# Altium PCB MainBoardPCB1.PcbDoc (part 11 of 40)
Units mm, origin at the board's own origin, x right, y up, seen from the top; angles counter-clockwise.
Board outline 258.95 x 308.86 mm, 16 copper layers (L1, L2 (GND), L3 (Sign), L4 (GND), L5 (Sign), L6 (PWR/GND), L7(PWR/GND), L8 (Plane_GND), L9 (PWR/GND), L10 (PWR/GND), L11 (PWR/GND), L12 (Sign), L13 (GND), L14 (Sign), L15 (GND), L16), stack 2.502 mm thick; 2397 components, 1744 nets, 8397 pads, 4112 vias.
Unrouted connection lines stored in the file: 3547.
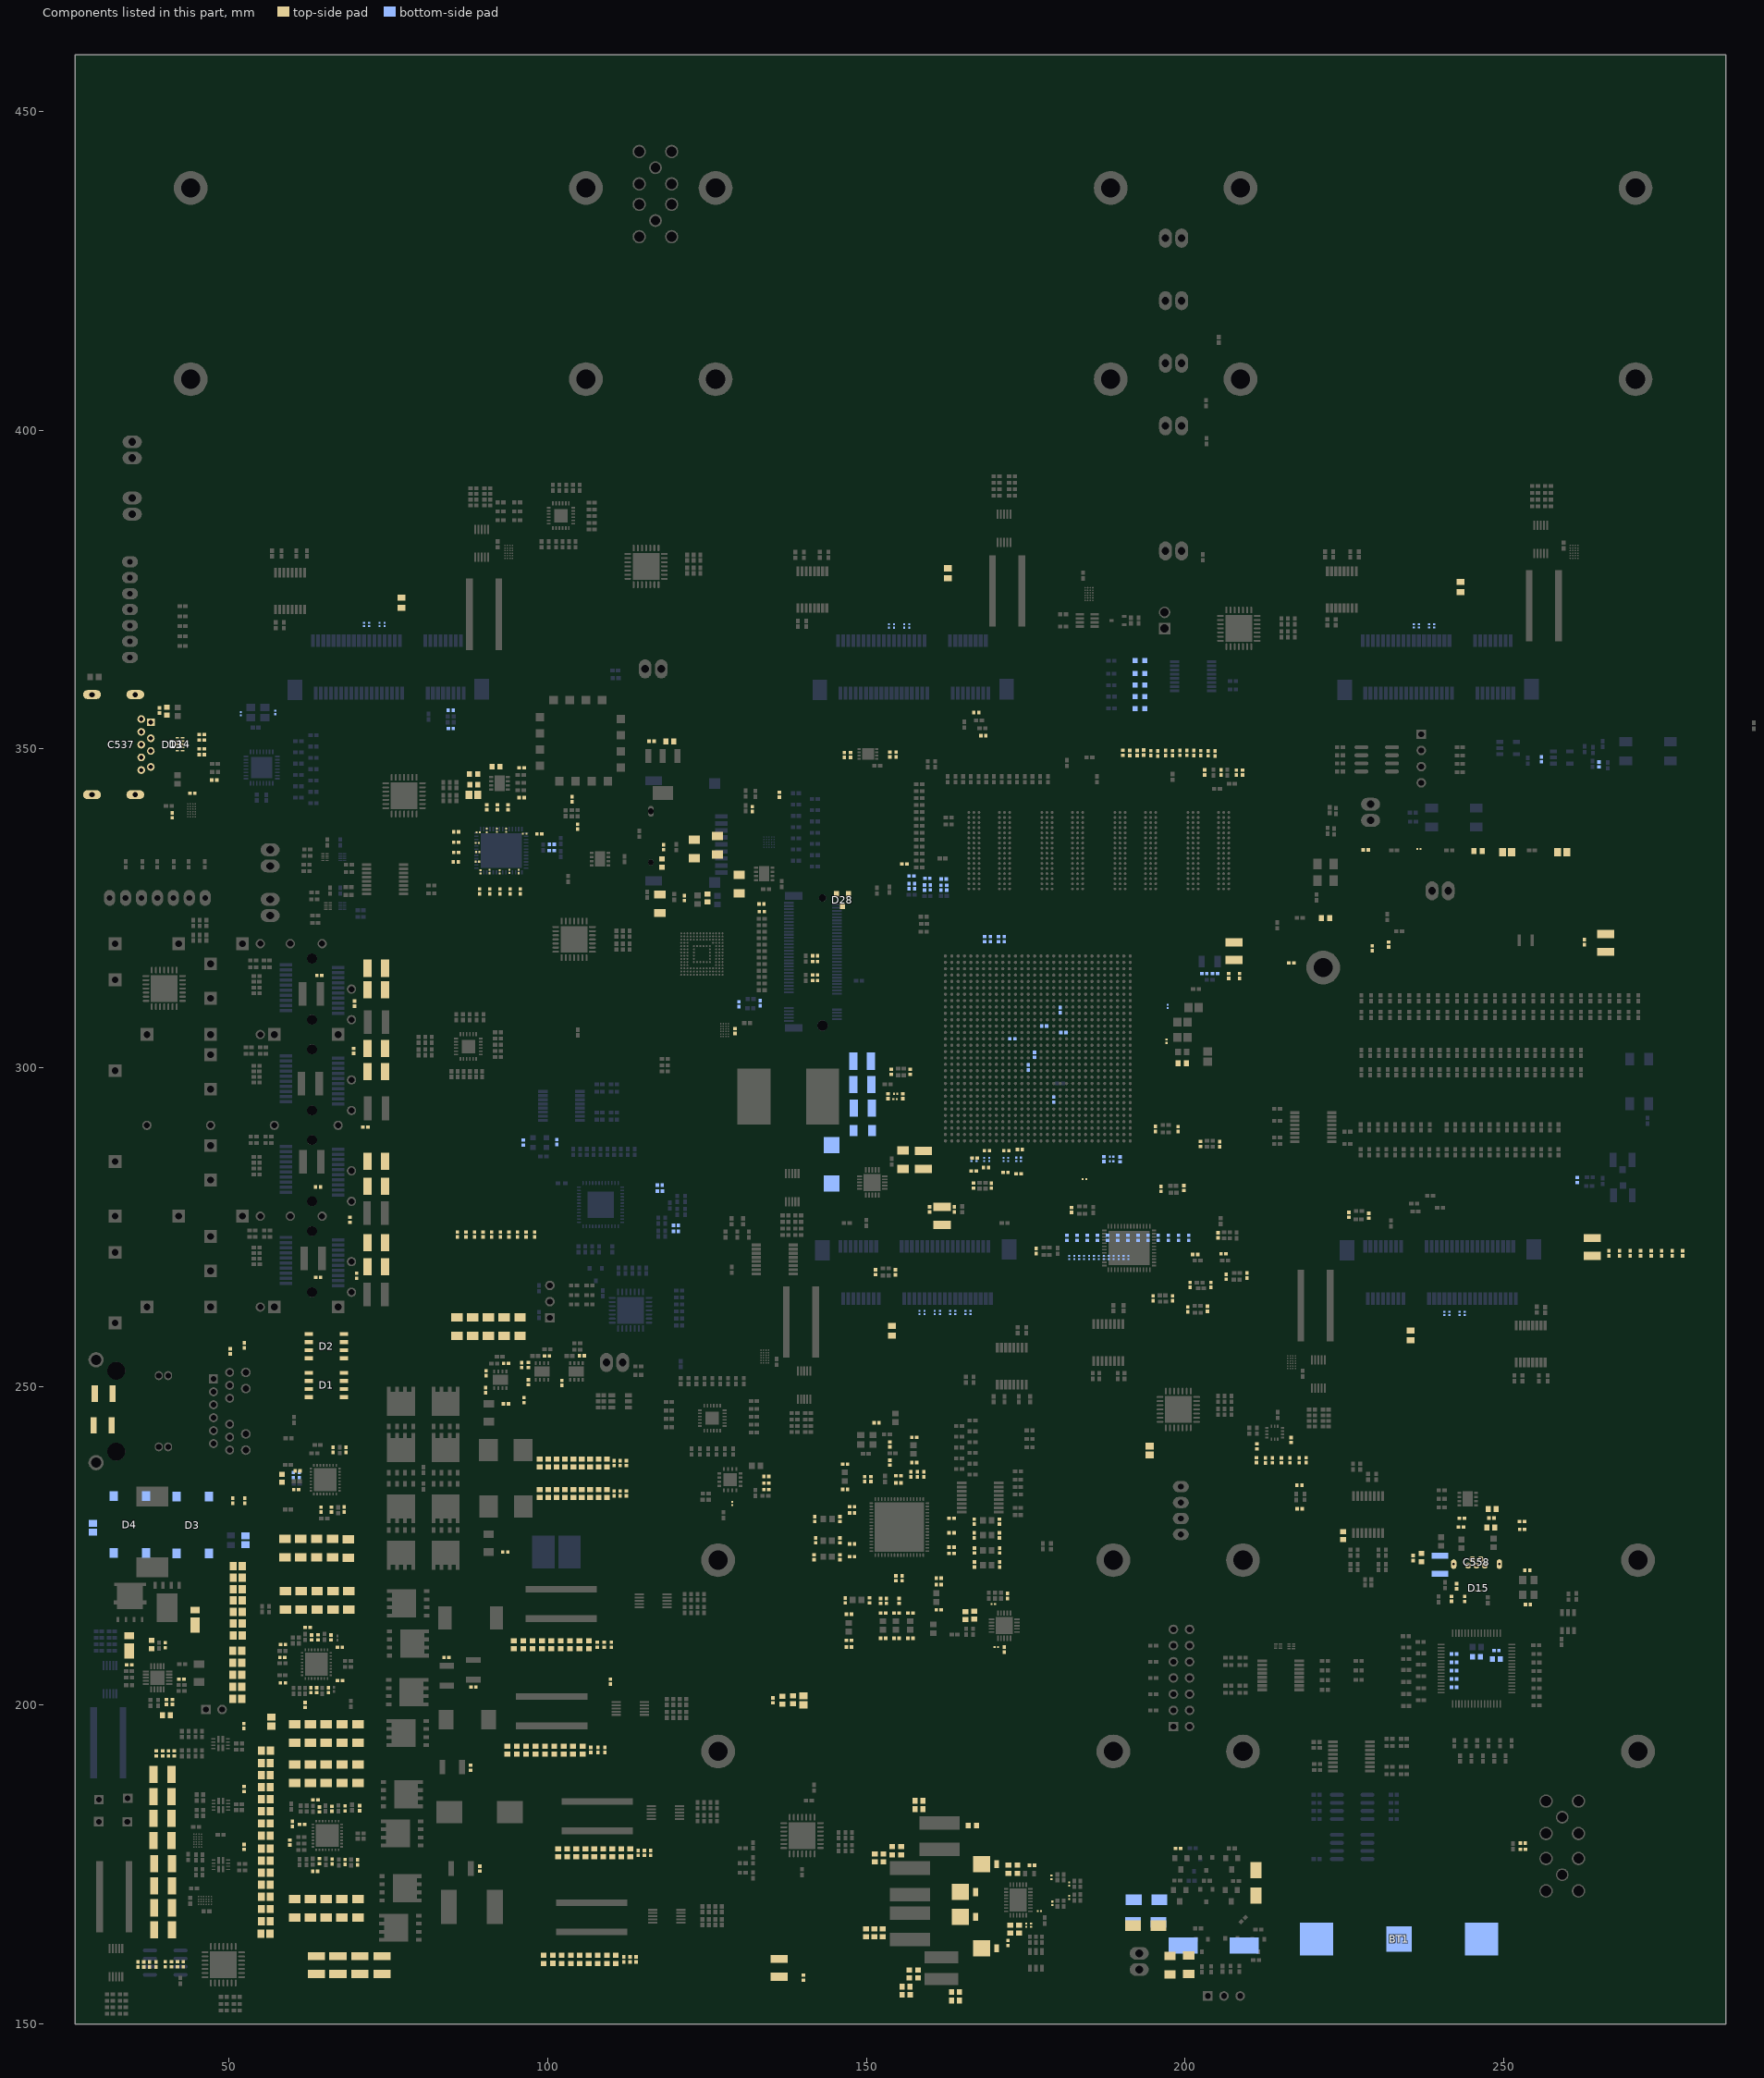
[diagram p19: the components of this part, seen from the top]

## Part data (continued)
D14: "TVS DIODE 5.5V 8V 10SON", Breakdown Voltage=7V, Capacitance=0.8pF, Clamping Voltage=8V, Current Rating=5A, Manufacturer="Texas Instruments", Max Operating Temperature=85°C, Min Operating Temperature=-40°C, Package Quantity=1, Peak Pulse Current=1A, Peak Pulse Power=45W, Power Line Protection=Yes, Reverse Standoff Voltage=5.5V, Supplier Part Number 1=296-28063-1-ND, Category="TVS Diodes", ComponentLink1Description=https://datasheet.ciiva.com/339/tpd4eusb30-339202.pdf?src-supplier=Digi-Key, ComponentLink1URL=https://datasheet.ciiva.com/339/tpd4eusb30-339202.pdf?src-supplier=Digi-Key, ComponentLink2Description=https://datasheet.ciiva.com/41659/1634000-41659268.pdf?src-supplier=Farnell, ComponentLink2URL=https://datasheet.ciiva.com/41659/1634000-41659268.pdf?src-supplier=Farnell, ComponentLink3Description=https://datasheet.ciiva.com/15134/getdatasheetpartid-299321-15134669.pdf?src-supplier=Verical, ComponentLink3URL=https://datasheet.ciiva.com/15134/getdatasheetpartid-299321-15134669.pdf?src-supplier=Verical, ComponentLink4Description=https://datasheet.ciiva.com/339/tpd4eusb30-339204.pdf?src-supplier=Digi-Key, ComponentLink4URL=https://datasheet.ciiva.com/339/tpd4eusb30-339204.pdf?src-supplier=Digi-Key, ComponentLink5Description=https://datasheet.ciiva.com/1504/1882087-1504249.pdf?src-supplier=Element14, ComponentLink5URL=https://datasheet.ciiva.com/1504/1882087-1504249.pdf?src-supplier=Element14, ComponentLink6Description=https://datasheet.ciiva.com/339/tpd4eusb30-339203.pdf?src-supplier=Digi-Key, ComponentLink6URL=https://datasheet.ciiva.com/339/tpd4eusb30-339203.pdf?src-supplier=Digi-Key, ComponentLink7Description=https://datasheet.ciiva.com/22621/1882087-22621482.pdf?src-supplier=Element14, ComponentLink7URL=https://datasheet.ciiva.com/22621/1882087-22621482.pdf?src-supplier=Element14, Data Rate=6Gbps, Depth=1mm, Direction=Unidirectional, ESD Protection=Yes, Height=0.5mm, Interface=USB, Lead Free="Lead Free", Length=2.5mm, Manufacturer Part Number=TPD4EUSB30DQAR, Min Breakdown Voltage=8V, Number of Bidirectional Channels=4, Number of Channels=4, Number of Pins=10, Packaging="Tape and Reel", Pricing 1="1=0,81000, 10=0,71400, 25=0,67040, 100=0,48670, 250=0,46936, 500=0,40664, 1000=0,34608 (USD)", Radiation Hardening=No, REACH SVHC="No SVHC", RoHS=Yes, Stock 1=69157, Supplier 1=Digi-Key, Termination=SMD/SMT, Width=1.1mm, Working Voltage=5.5V
D16 D17 D18 D19: library part MBRM140T1G, Supplier Part Number 1=MBRM140T3GOSCT-ND, Supplier 1=Digi-Key
D20 D21 D23 D24: "DIODE GEN PURP 1KV 1A SMA", Average Rectified Current=1A, Capacitance=10pF, Case/Package=SMA, Forward Voltage="Vf = 1.1V", Manufacturer=Diodes, Max Forward Surge Current (Ifsm)=30A, Max Operating Temperature=150°C, Max Repetitive Reverse Voltage (Vrrm)=1kV, Min Operating Temperature=-65°C, Package Quantity=5000, Peak Reverse Current=5uA, Supplier Part Number 1=S1M-FDICT-ND, Category="Rectifier Diodes", ComponentLink1Description=https://datasheet.ciiva.com/34302/1541642-34302418.pdf?src-supplier=Jameco, ComponentLink1URL=https://datasheet.ciiva.com/34302/1541642-34302418.pdf?src-supplier=Jameco, ComponentLink2Description=https://datasheet.ciiva.com/22695/1911706-22695834.pdf?src-supplier=Element14, ComponentLink2URL=https://datasheet.ciiva.com/22695/1911706-22695834.pdf?src-supplier=Element14, Current Rating=1A, Forward Current=1A, Height=2.1mm, Lead Free="Lead Free", Length=4.6mm, Manufacturer Part Number=S1M-13-F, Max Reverse Voltage (DC)=1kV, Number of Pins=2, Output Current=1A, Packaging="Tape and Reel", Peak Non-Repetitive Surge Current=30A, Polarity=Standard, Pricing 1="1=0,25000, 10=0,20100, 25=0,16840, 100=0,08240, 250=0,08104, 500=0,06870, 1000=0,04774, 2500=0,04437 (USD)", Radiation Hardening=No, REACH SVHC="No SVHC", Recovery Time=1.8us, Reverse Recovery Time=3us, Reverse Voltage (DC)=1kV, RoHS=Yes, Stock 1=1021310, Supplier 1=Digi-Key, Termination=SMD/SMT, Voltage Rating (DC)=1kV, Weight=0.002258oz, Width=2.92mm
D26 D27: "DIODE SCHOTTKY 100V POWERDI123", Average Rectified Current=1A, Capacitance=36pF, Forward Voltage=770mV, Manufacturer=Diodes, Max Forward Surge Current (Ifsm)=40A, Max Operating Temperature=175°C, Max Repetitive Reverse Voltage (Vrrm)=100V, Min Operating Temperature=-55°C, Package Quantity=3000, Peak Non-Repetitive Surge Current=50A, Peak Reverse Current=1uA, Supplier Part Number 1=DFLS1100DICT-ND, Category="Rectifier Diodes", ComponentLink1Description=https://datasheet.ciiva.com/6932/ds30497-6932064.pdf?src-supplier=Newark, ComponentLink1URL=https://datasheet.ciiva.com/6932/ds30497-6932064.pdf?src-supplier=Newark, ComponentLink2Description=https://datasheet.ciiva.com/4715/ds30497-81105-4715653.pdf?src-supplier=Mouser, ComponentLink2URL=https://datasheet.ciiva.com/4715/ds30497-81105-4715653.pdf?src-supplier=Mouser, ComponentLink3Description=https://datasheet.ciiva.com/4245/2460ds30497-4245287.pdf?src-supplier=Arrow, ComponentLink3URL=https://datasheet.ciiva.com/4245/2460ds30497-4245287.pdf?src-supplier=Arrow, ComponentLink4Description=https://datasheet.ciiva.com/15144/getdatasheetpartid-44146-15144126.pdf?src-supplier=Verical, ComponentLink4URL=https://datasheet.ciiva.com/15144/getdatasheetpartid-44146-15144126.pdf?src-supplier=Verical, ComponentLink5Description=https://datasheet.ciiva.com/26788/dfls1100-7-26788776.pdf?src-supplier=IIIC, ComponentLink5URL=https://datasheet.ciiva.com/26788/dfls1100-7-26788776.pdf?src-supplier=IIIC, ComponentLink6Description=https://datasheet.ciiva.com/914/ds30497-914548.pdf?src-supplier=Digi-Key, ComponentLink6URL=https://datasheet.ciiva.com/914/ds30497-914548.pdf?src-supplier=Digi-Key, ComponentLink7Description=https://datasheet.ciiva.com/914/ds30497-914549.pdf?src-supplier=Digi-Key, ComponentLink7URL=https://datasheet.ciiva.com/914/ds30497-914549.pdf?src-supplier=Digi-Key, ComponentLink8Description=https://datasheet.ciiva.com/914/ds30497-914550.pdf?src-supplier=Digi-Key, ComponentLink8URL=https://datasheet.ciiva.com/914/ds30497-914550.pdf?src-supplier=Digi-Key, ComponentLink9Description=https://datasheet.ciiva.com/7964/ds30497-7964246.pdf?src-supplier=Element14, ComponentLink9URL=https://datasheet.ciiva.com/7964/ds30497-7964246.pdf?src-supplier=Element14, ComponentLink10Description=https://datasheet.ciiva.com/22695/1915475-22695803.pdf?src-supplier=Element14, ComponentLink10URL=https://datasheet.ciiva.com/22695/1915475-22695803.pdf?src-supplier=Element14, Current Rating=1A, Element Configuration=Single, Forward Current=1A, Height=0.98mm, Lead Free="Lead Free", Length=2.8mm, Manufacturer Part Number=DFLS1100-7, Max Reverse Voltage (DC)=100V, Mount="Surface Mount", Number of Pins=2, Output Current=1A, Packaging="Tape and Reel", Polarity=Standard, Pricing 1="1=0,41000, 10=0,35100, 25=0,32760, 100=0,24340, 250=0,23120, 500=0,19000, 1000=0,15444 (USD)", Radiation Hardening=No, REACH SVHC="No SVHC", RoHS=Yes, Stock 1=113187, Supplier 1=Digi-Key, Termination=SMD/SMT, Voltage Rating (DC)=100V, Width=1.78mm
D28: "DIODE ARRAY SCHOTTKY 40V SOT23", Average Rectified Current=200mA, Capacitance=5pF, Case/Package=SOT-23, Forward Voltage=1V, Manufacturer=MCC, Max Forward Surge Current (Ifsm)=600mA, Max Operating Temperature=125°C, Max Repetitive Reverse Voltage (Vrrm)=40V, Max Reverse Leakage Current=200nA, Min Operating Temperature=-55°C, Package Quantity=3000, Power Dissipation=200mW, Supplier Part Number 1=BAS40-04TPMSCT-ND, ComponentLink1Description=https://datasheet.ciiva.com/23684/1684803-23684306.pdf?src-supplier=Newark, ComponentLink1URL=https://datasheet.ciiva.com/23684/1684803-23684306.pdf?src-supplier=Newark, ComponentLink2Description=https://datasheet.ciiva.com/4716/bas40-bas70sot-23-28891-4716000.pdf?src-supplier=Mouser, ComponentLink2URL=https://datasheet.ciiva.com/4716/bas40-bas70sot-23-28891-4716000.pdf?src-supplier=Mouser, ComponentLink3Description=https://datasheet.ciiva.com/906/bas40-bas70sot-23-906320.pdf?src-supplier=Digi-Key, ComponentLink3URL=https://datasheet.ciiva.com/906/bas40-bas70sot-23-906320.pdf?src-supplier=Digi-Key, ComponentLink4Description=https://datasheet.ciiva.com/15200/getdatasheetpartid-226544-15200426.pdf?src-supplier=Verical, ComponentLink4URL=https://datasheet.ciiva.com/15200/getdatasheetpartid-226544-15200426.pdf?src-supplier=Verical, ComponentLink5Description=https://datasheet.ciiva.com/7624/1684803-7624699.pdf?src-supplier=Element14, ComponentLink5URL=https://datasheet.ciiva.com/7624/1684803-7624699.pdf?src-supplier=Element14, ComponentLink6Description=https://datasheet.ciiva.com/906/bas40-bas70sot-23-906318.pdf?src-supplier=Digi-Key, ComponentLink6URL=https://datasheet.ciiva.com/906/bas40-bas70sot-23-906318.pdf?src-supplier=Digi-Key, ComponentLink7Description=https://datasheet.ciiva.com/906/bas40-bas70sot-23-906319.pdf?src-supplier=Digi-Key, ComponentLink7URL=https://datasheet.ciiva.com/906/bas40-bas70sot-23-906319.pdf?src-supplier=Digi-Key, Element Configuration=Single, Forward Current=200mA, Height=1.02mm, Lead Free="Lead Free", Length=3.04mm, Manufacturer Part Number=BAS40-04-TP, Max Reverse Voltage (DC)=40V, Max Surge Current=600mA, Mount="Surface Mount", Number of Pins=3, Packaging="Tape and Reel", Peak Non-Repetitive Surge Current=600mA, Peak Reverse Current=200nA, Pricing 1="1 = 0,39000, 10 = 0,28800, 25 = 0,25240, 100 = 0,13700, 250 = 0,13628, 500 = 0,11176, 1000 = 0,08292 (USD)", Radiation Hardening=No, REACH SVHC=Unknown, Recovery Time=5ns, Reverse Recovery Time=5ns, RoHS=Yes, Stock 1=1204011, Supplier 1=Digi-Key, Width=1.4mm
F1_PCIE0 F1_PCIE1 F1_PCIE2 F1_PCIE3 F1_PCIE4: library part Resistor, "FUSE BOARD MNT 500MA 32VDC 0805", Case/Package=SMD/SMT, Case Code (Imperial)=0805, Case Code (Metric)=2012, Current Rating=500mA, DC Cold Resistance=570mR, Manufacturer=Vishay, Manufacturer Part Number=MFU0805FF00500P100, Max Operating Temperature=125°C, Min Operating Temperature=-55°C, Package Quantity=1000, Supplier Part Number 1=MFU0805.50CT-ND, Voltage Rating (DC)=32V, Approvals=UL, Category=Fuses, ComponentLink1Description=https://datasheet.ciiva.com/7650/mfuserie-7650777.pdf?src-supplier=Element14, ComponentLink1URL=https://datasheet.ciiva.com/7650/mfuserie-7650777.pdf?src-supplier=Element14, ComponentLink2Description=https://datasheet.ciiva.com/16393/mfuserie-16393883.pdf?src-supplier=Future+Electronics, ComponentLink2URL=https://datasheet.ciiva.com/16393/mfuserie-16393883.pdf?src-supplier=Future+Electronics, ComponentLink3Description=https://datasheet.ciiva.com/8057/1480005-8057902.pdf?src-supplier=Element14, ComponentLink3URL=https://datasheet.ciiva.com/8057/1480005-8057902.pdf?src-supplier=Element14, ComponentLink4Description=https://datasheet.ciiva.com/11337/mfuserie-11337759.pdf?src-supplier=Avnet, ComponentLink4URL=https://datasheet.ciiva.com/11337/mfuserie-11337759.pdf?src-supplier=Avnet, Depth=1.25mm, Fuse Current=500mA, Fuse Type="Board Mount (Cartridge Style Excluded)", Height=0.018inch, Housing Material=Ceramic, Length=0.079inch, Mount="Surface Mount", Number of Pins=2, Packaging="Tape and Reel", Pricing 1="1=0,63000, 5=0,60800, 10=0,58900, 50=0,49560, 100=0,41140, 250=0,37400, 500=0,31790 (USD)", Radiation Hardening=No, REACH SVHC="No SVHC", RoHS=Yes, Stock 1=14752, Supplier 1=Digi-Key, Width=0.049inch, Working Voltage=32V
FB2: library part "Ferrite Chip", "SMT Ferrite Chip", Part Number=CIS10P221NC, Supplier Part Number 1=1276-6350-1-ND, Supplier 1=Digi-Key, Supplier 2=Digi-Key, Supplier Part Number 2=490-5225-1-ND